# Altium PCB ePBR25_ACU_Power_rev0.PcbDoc (part 5 of 5)
Units mil, origin at the board's own origin, x right, y up, seen from the top; angles counter-clockwise.
Board outline 8211 x 3959 mil, 2 copper layers (Top Layer, Bottom Layer); 145 components, 129 nets, 544 pads, 1610 vias.
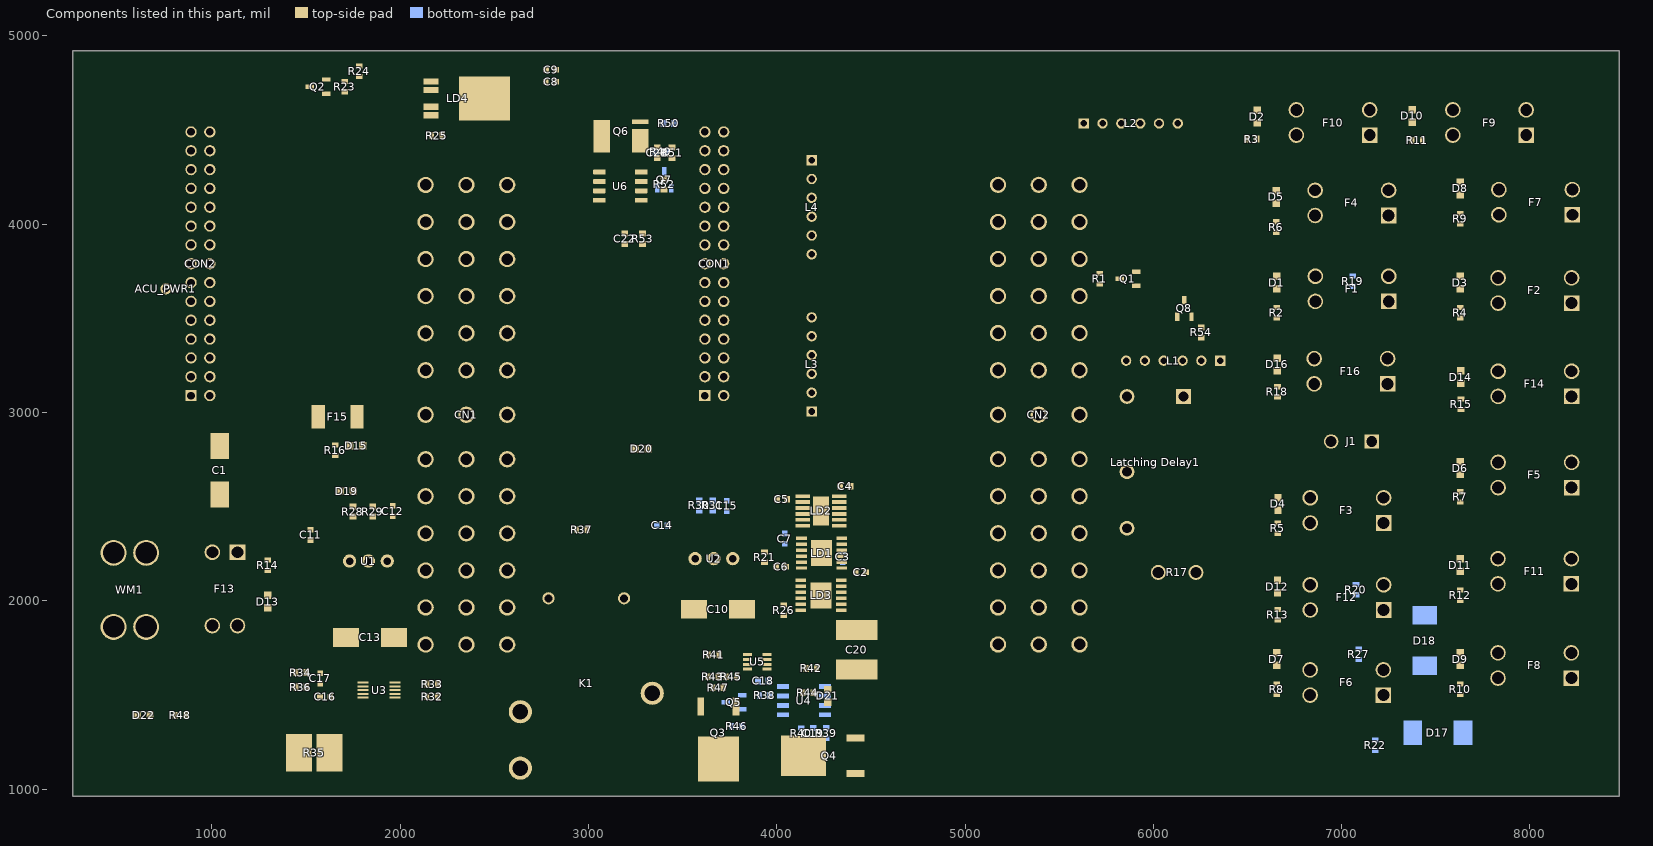
[diagram p4: the components of this part, seen from the top]

## Silkscreen, mask and mechanical layers (free items; w line width, h text height)
Top Overlay:
  drawing of 20 lines, arcs and shapes, not listed
  text "ePBR25_ACU_Power_rev0" at 2972.99,4742 h60
  text "ACU" at 6858.38,4714 h60
  text "ACC FANS" at 7550.04,4714 h60
  text "Latching_Delayed" at 3677.38,4690.34 h40
  text "IMD" at 6973.69,4283 h60
  text "BSPD_PWR" at 2517,4278.58 h30
  text "HVB_PWR" at 2258,4277 h30
  text "E_METER" at 7830.12,4270 h60
  text "ACC_FAN_PWR" at 1847,4265 h30
  text "AMS_LED" at 5672,4198 h30
  text "AMS_PWR" at 2255.26,4079 h30
  text "PRECHRG_CTRL" at 2521.19,4079 h30
  text "EMETER_PWR" at 1872.77,4075.24 h30
  text "IMD_RESIST" at 1880,3881.4 h30
  text "AIR+CTRL" at 2214.19,3879.62 h30
  text "AMS_CLR_ERR" at 2509.64,3878.24 h30
  text "BRAKE_SENS" at 5655,3854 h30
  text "BUZR" at 6924.09,3828 h60
  text "BMS" at 7944,3803 h60
  text "EXTRA_INPUT2" at 1841.9,3680.18 h30
  text "AIR-_CTRL" at 2234.33,3680 h30
  text "AIR+_FB" at 2552.8,3680 h30
  text "PRAKE_PRESSn" at 5574,3523 h30
  text "AIR-_FB" at 1995.1,3482.64 h30
  text "IMD_OK" at 2280.99,3482.64 h30
  text "EXTRA_INPUT1" at 2528.46,3479.07 h30
  text "VCU_PWR" at 5668,3405 h30
  text "BSPD TEST" at 6749,3375 h60
  text "HVB" at 7944,3323 h60
  text "BRAKE_PWR" at 5498,3301 h30
  text "SWO" at 2053.96,3285.5 h30
  text "CAN_SENS_N" at 2215.09,3285.27 h30
  text "CAN_SENS_P" at 2598.96,3264.48 h30
  text "SCHT_OUT_LATCH" at 5298,3089 h30
  text "A\M\S\_\O\K\" at 2246.45,3049.43 h20
  text "ACC_FAN_CTRL" at 1944.61,3042.89 h20
  text "SCHT_TAP" at 2626,3021.84 h30
  text "RED_LED_GND" at 5392.52,2836.39 h30
  text "VCU" at 7935,2821 h60
  text "HCP_SENS_PWR" at 1943,2811.33 h20
  text "HCP_L_CURR_SENS" at 2577,2811 h20
  text "HCP_H_CURR_SENS" at 2233,2807.33 h20
  text "BUZR_PWR" at 5491.5,2626.7 h30
  text "PUMP" at 6957,2626 h60
  text "TS_ACTIVE" at 2460,2620 h30
  text "5V" at 3326.35,2598.16 h60
  text "GND" at 2099,2419 h30
  text "SWDIO" at 2289,2415 h30
  text "STATUS LIGHT" at 7671,2326.37 h60
  text "NRST" at 2299,2221.89 h30
  text "SWCLK" at 2079,2220 h30
  text "MC_PW" at 6811.84,2193.13 h60
  text "FANS_PWR" at 5661.26,2147.92 h30
  text "3V3" at 1586,2100.92 h60 r90
  text "3V3" at 2319,2018 h30
  text "PUMP_PWR" at 5670.06,1949.88 h30
  text "VBATT_FUSE" at 2030,1882 h30
  text "BRAKE" at 7844,1817 h60
  text "FANS" at 6893,1749 h60
  text "UV/OV FAULT" at 4366.06,1460.38 h30
  text "RVRS" at 628,1242 h60
  text "LOCK_IN" at 6842,1073 h150
Board Outline:
  lines w10: 262.13,4920 8473,4920 8473,962 262,961 262,4903 262.13,4903.13 262.13,4920 ; 262.13,4920 262.13,4920

## Text inside footprints (layer, text, board x,y; h text height)
CON1: Top Overlay "B15" at 3790.85,4477.2 h30; Top Overlay "A15" at 3593.39,4560.65 h30; Top Overlay "B1" at 3785.93,3046.89 h30; Top Overlay "A1" at 3506.4,3038.03 h30
CON2: Top Overlay "A1" at 777.39,3038.03 h30; Top Overlay "B1" at 1056.91,3046.89 h30; Top Overlay "A15" at 739.98,4474.25 h30; Top Overlay "B15" at 1061.83,4477.2 h30
LD1: Top Overlay "*" at 4104.78,2339.48 h50; Mechanical 13 "*" at 4161.75,2298.24 h50
LD3: Top Overlay "*" at 4095,2117 h50; Mechanical 13 "*" at 4158.75,2074.74 h50
Q3: Mechanical 1 "*" at 3784,1347 h31.25 r180
Q4: Mechanical 1 "*" at 4327.14,1082.95 h31.25 r90
WM1: Top Overlay "1" at 472.77,2542.85 h30 r90